# Altium PCB main_ADC_PCB.PcbDoc (part 4 of 8)
Units mm, origin at the board's own origin, x right, y up, seen from the top; angles counter-clockwise.
Board outline 150 x 100 mm, 4 copper layers (Top Layer, Layer 1, Layer 2, Bottom Layer), stack 1.62 mm thick; 535 components, 354 nets, 1725 pads, 1075 vias.
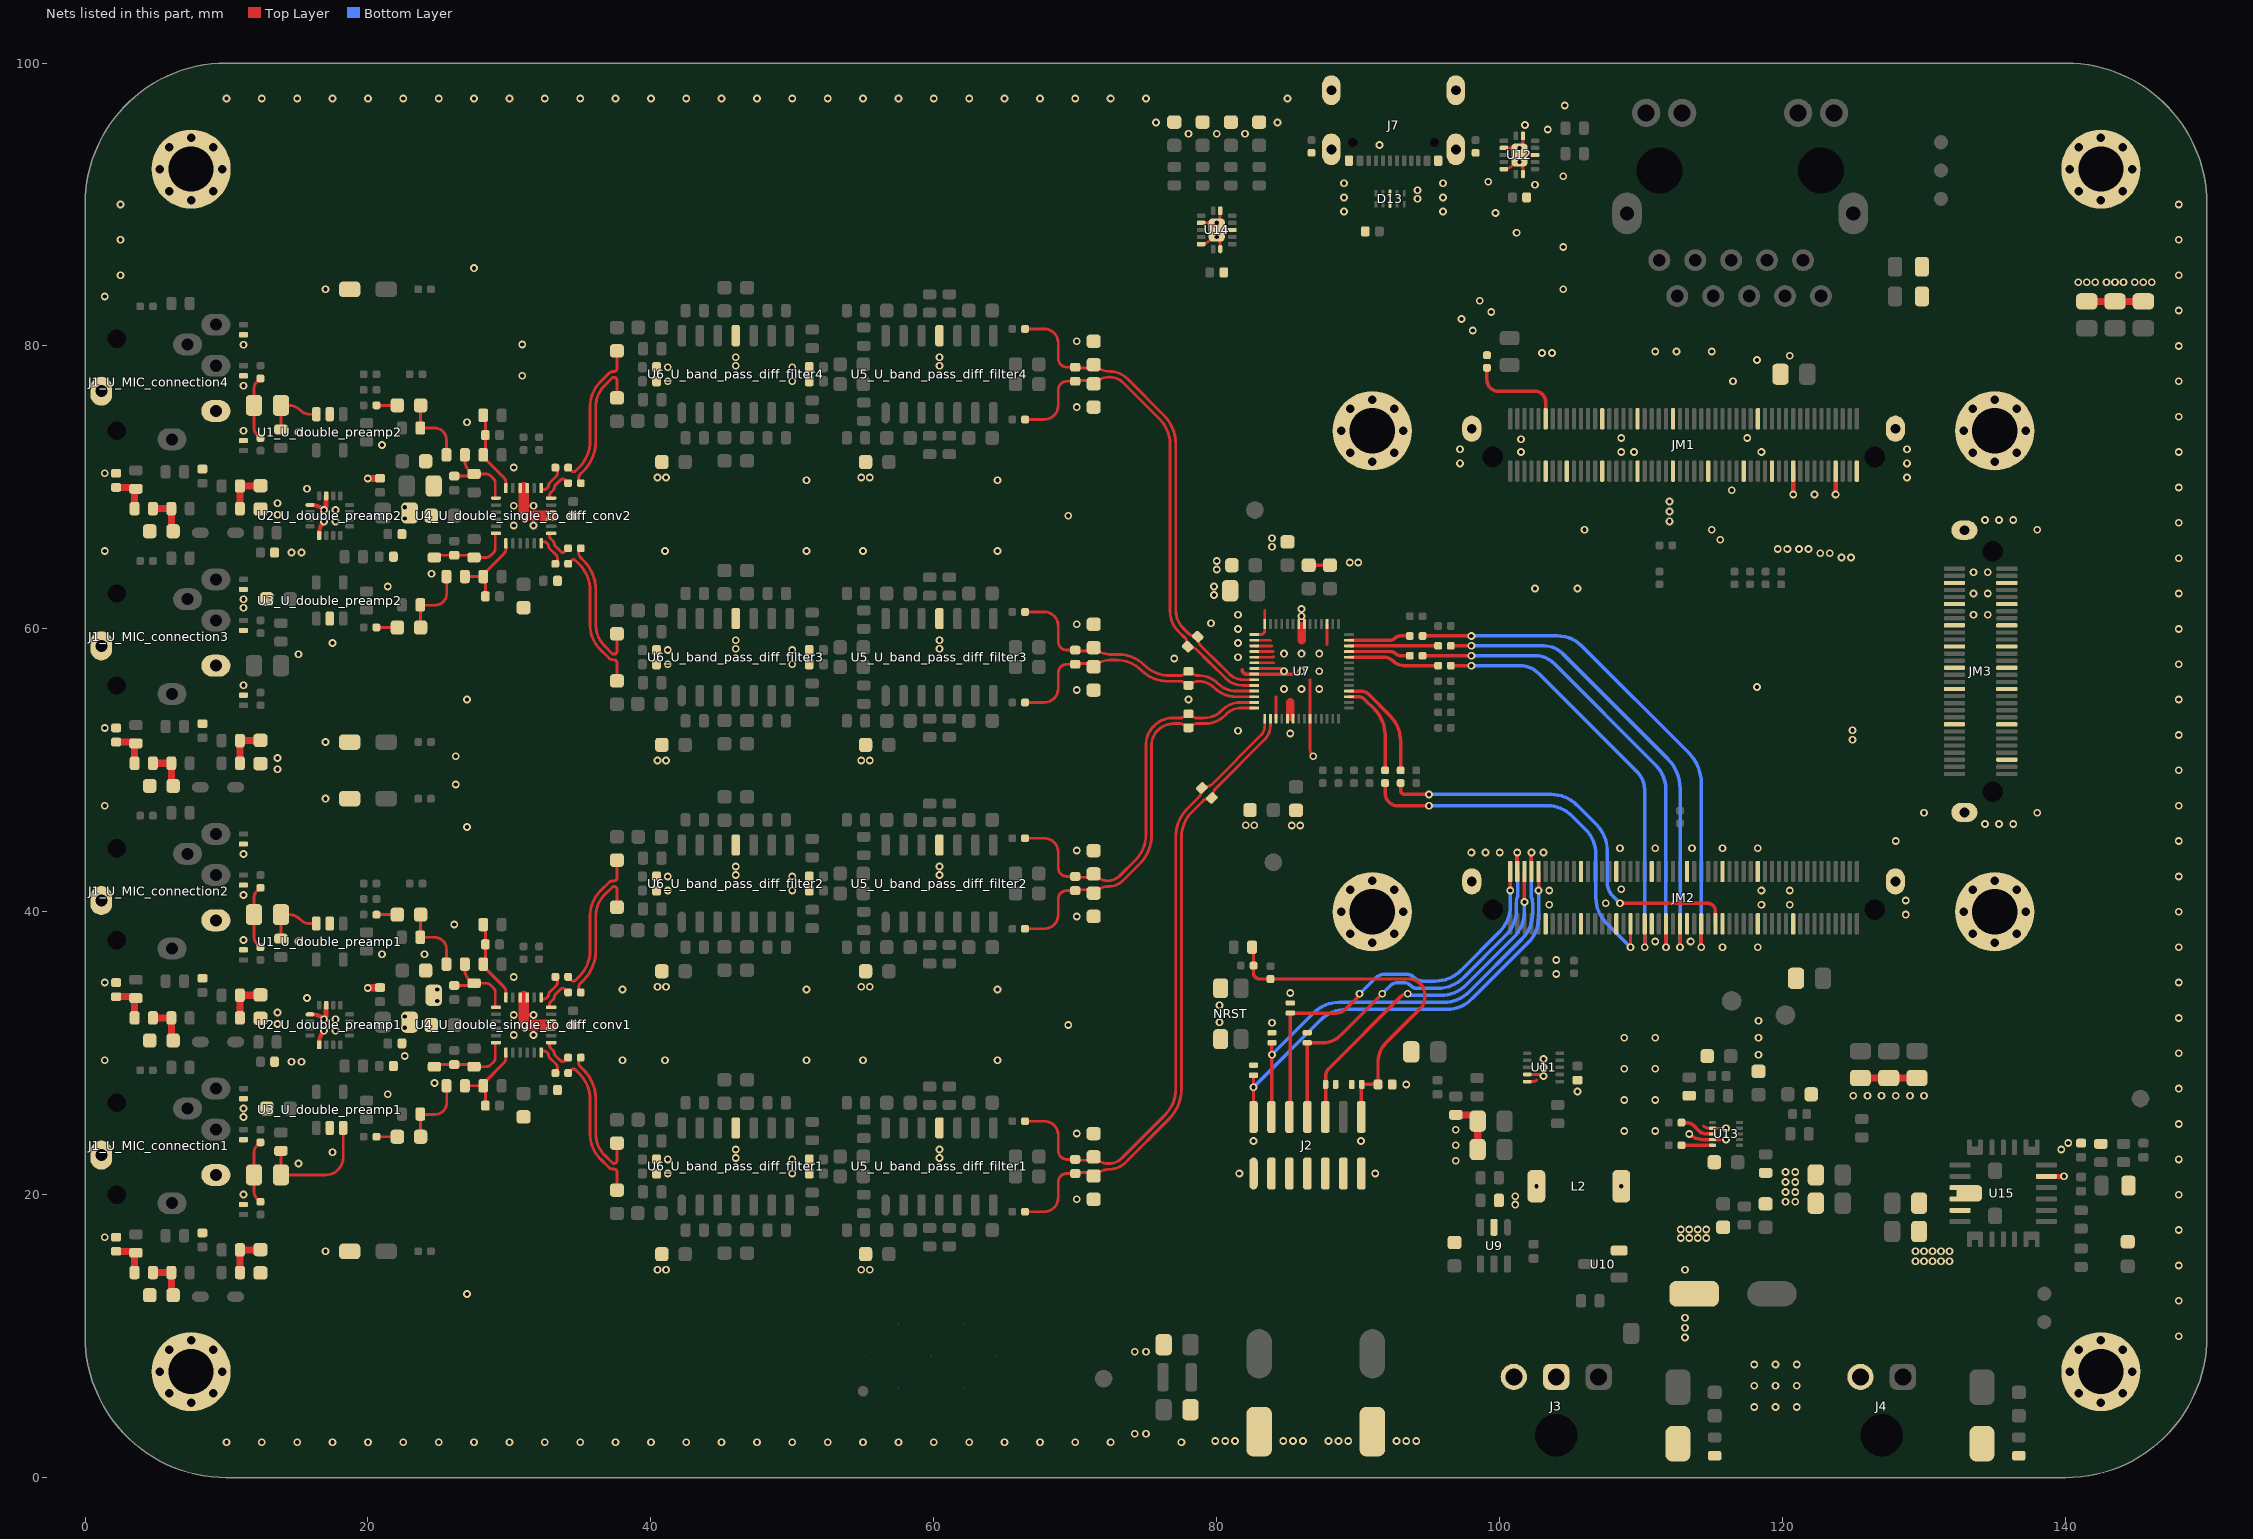
[diagram p6: the nets of this part, all layers, seen from the top]

## Via types
v1: diameter 0.55, hole 0.3, Top Layer to Bottom Layer, tented both sides, 1011 vias
v2: diameter 1, hole 0.6, Top Layer to Bottom Layer, 64 vias

## Nets (pads, with @x,y where several pads share a name; then routed paths per layer and width w, separated by ;. In a path a pad name is that pad's centre, name@x,y a point inside that pad or via, vN(x,y) a via of type N, cw(c..) or ccw(c..) an arc to the next point about the centre after c; other vN are vias at no path point) (continued)
GND: C1_U_MIC_connection1.1 C1_U_MIC_connection2.1 C1_U_MIC_connection3.1 C1_U_MIC_connection4.1 C2_U_MIC_connection1.1 C2_U_MIC_connection2.1 C2_U_MIC_connection3.1 C2_U_MIC_connection4.1 C3_U_MIC_connection1.2 C3_U_MIC_connection2.2 C3_U_MIC_connection3.2 C3_U_MIC_connection4.2 C4_U_double_preamp1.2 C4_U_double_preamp2.2 C7_U_double_preamp1.2 C7_U_double_preamp2.2 C8_U_double_preamp1.1 C8_U_double_preamp2.1 C9_U_double_preamp1.1 C9_U_double_preamp2.1 C10_U_double_preamp1.2 C10_U_double_preamp2.2 C11_U_double_preamp1.2 C11_U_double_preamp2.2 C12_U_double_preamp1.2 C12_U_double_preamp2.2 C13_U_double_preamp1.2 C13_U_double_preamp2.2 C16_U_double_single_to_diff_conv1.1 C16_U_double_single_to_diff_conv2.1 C17_U_double_single_to_diff_conv1.1 C17_U_double_single_to_diff_conv2.1 C18_U_double_single_to_diff_conv1.2 C18_U_double_single_to_diff_conv2.2 C19_U_double_single_to_diff_conv1.2 C19_U_double_single_to_diff_conv2.2 C26_U_band_pass_diff_filter1.1 C26_U_band_pass_diff_filter2.1 C26_U_band_pass_diff_filter3.1 C26_U_band_pass_diff_filter4.1 C29_U_band_pass_diff_filter1.2 C29_U_band_pass_diff_filter2.2 C29_U_band_pass_diff_filter3.2 C29_U_band_pass_diff_filter4.2 C30_U_band_pass_diff_filter1.2 C30_U_band_pass_diff_filter2.2 C30_U_band_pass_diff_filter3.2 C30_U_band_pass_diff_filter4.2 C41_U_band_pass_diff_filter1.2 C41_U_band_pass_diff_filter2.2 C41_U_band_pass_diff_filter3.2 C41_U_band_pass_diff_filter4.2 C42_U_band_pass_diff_filter1.2 C42_U_band_pass_diff_filter2.2 C42_U_band_pass_diff_filter3.2 C42_U_band_pass_diff_filter4.2 C43_U_band_pass_diff_filter1.2 C43_U_band_pass_diff_filter2.2 C43_U_band_pass_diff_filter3.2 C43_U_band_pass_diff_filter4.2 C44_U_band_pass_diff_filter1.1 C44_U_band_pass_diff_filter2.1 C44_U_band_pass_diff_filter3.1 C44_U_band_pass_diff_filter4.1 C45_U_band_pass_diff_filter1.1 C45_U_band_pass_diff_filter2.1 C45_U_band_pass_diff_filter3.1 C45_U_band_pass_diff_filter4.1 C46_U_MIC_connection1.2 C46_U_MIC_connection2.2 C46_U_MIC_connection3.2 C46_U_MIC_connection4.2 C47.2 C48.1 C49.1 C50.2 C51.2 C52.2 C53.2 C54.2 C55.2 C56.2 C58.2 C59.2 C60.2 C61.2 C62.1 C64.2 C65.2 C66.2 C67.1 C68.1 C69.1 C70.2 C71.1 C72.2 C73.2 C74.2 C75.2 C76.1 C77.1 C78.1 C79.1 C80.1 C81.1 C82.1 C83.1 C84.1 C85.1 C86.1 C87.2 C89.2 C91.1 D2_U_MIC_connection1.1 D2_U_MIC_connection2.1 D2_U_MIC_connection3.1 D2_U_MIC_connection4.1 D3_U_MIC_connection1.1 D3_U_MIC_connection2.1 D3_U_MIC_connection3.1 D3_U_MIC_connection4.1 D4_U_MIC_connection1.1 D4_U_MIC_connection2.1 D4_U_MIC_connection3.1 D4_U_MIC_connection4.1 D5.1 D6.2 D8.2 D9.2 D10.2 D11.2 D12.2 D13.3 D13.8 D14.1 D15.1 D17.2 D18.2 D19.2 D20.2 D21.1 D22.1 D23.1 J1_U_MIC_connection1.1 J1_U_MIC_connection1.4 J1_U_MIC_connection2.1 J1_U_MIC_connection2.4 J1_U_MIC_connection3.1 J1_U_MIC_connection3.4 J1_U_MIC_connection4.1 J1_U_MIC_connection4.4 J2.1 J2.3 J2.5 J2.7 J2.9 J2.11 J2.13 J3.1 J3.2 J4.1 J7.A1/B12 J7.B1/A12 J7.MT1 J7.MT2 J7.MT3 J7.MT4 JM1.1 JM1.7 JM1.19 JM1.25 JM1.30 JM1.33 JM1.43 JM1.53 JM1.54 JM1.63 JM1.64 JM1.73 JM1.74 JM1.83 JM1.89 JM1.S1 JM1.S2 JM2.19 JM2.29 JM2.30 JM2.39 JM2.40 JM2.49 JM2.50 JM2.59 JM2.60 JM2.69 JM2.70 JM2.79 JM2.80 JM2.89 JM2.S1 JM2.S2 JM3.5 JM3.6 JM3.11 JM3.12 JM3.17 JM3.18 JM3.23 JM3.24 JM3.29 JM3.30 JM3.35 JM3.36 JM3.45 JM3.46 JM3.55 JM3.S1 JM3.S2 L2.3 L2.4 MH1.1 MH2.1 MH3.1 MH4.1 MH5.1 MH6.1 MH7.1 MH8.1 NRST.3 NRST.4 R81.2 R85.2 R86.2 R89.2 R90.2 R91.2 R93.1 R95.1 R106.1 R113.2 R116.2 R122.2 R123.2 U1_U_double_preamp1.2 U1_U_double_preamp2.2 U2_U_double_preamp1.1 U2_U_double_preamp1.5 U2_U_double_preamp1.15 U2_U_double_preamp1.17 U2_U_double_preamp2.1 U2_U_double_preamp2.5 U2_U_double_preamp2.15 U2_U_double_preamp2.17 U3_U_double_preamp1.2 U3_U_double_preamp2.2 U4_U_double_single_to_diff_conv1.15 U4_U_double_single_to_diff_conv1.16 U4_U_double_single_to_diff_conv1.21 U4_U_double_single_to_diff_conv1.22 U4_U_double_single_to_diff_conv1.25 U4_U_double_single_to_diff_conv2.15 U4_U_double_single_to_diff_conv2.16 U4_U_double_single_to_diff_conv2.21 U4_U_double_single_to_diff_conv2.22 U4_U_double_single_to_diff_conv2.25 U5_U_band_pass_diff_filter1.11 U5_U_band_pass_diff_filter2.11 U5_U_band_pass_diff_filter3.11 U5_U_band_pass_diff_filter4.11 U6_U_band_pass_diff_filter1.11 U6_U_band_pass_diff_filter2.11 U6_U_band_pass_diff_filter3.11 U6_U_band_pass_diff_filter4.11 U7.17 U7.21 U7.22 U7.28 U7.29 U7.30 U7.31 U7.32 U7.33 U7.34 U7.35 U7.36 U7.45 U7.47 U7.48 U7.51 U7.57 U9.2 U10.2 U11.4 U11.5 U11.11 U12.1 U12.4 U12.7 U12.10 U12.13 U12.15 U13.2 U13.4 U13.11 U14.1 U14.4 U14.7 U14.10 U14.13 U14.15 U15.10 U15.12 U15.25 | length 74.3
  Top Layer w0.2: U2_U_double_preamp1.1@15.9,32.75 U2_U_double_preamp1.1@16.055,32.75 ; U2_U_double_preamp2.1@15.9,68.75 U2_U_double_preamp2.1@16.055,68.75 ; U2_U_double_preamp1.5@16.55,30.6 U2_U_double_preamp1.5@16.55,30.755 ; U2_U_double_preamp2.5@16.55,66.6 U2_U_double_preamp2.5@16.55,66.755 ; U14.13@78.9,87.2 ccw(c78.9,88.04) 79.494,87.446 U14.15@79.727,87.679 ; U14.10@78.9,88.7 v1(80,88.7) ccw(c79.396,89.304) 80.25,89.304 U14.7@80.25,89.55 ; v1(80,87.7) cw(c79.396,87.096) 80.25,87.096 U14.1@80.25,86.85 ; U14.15@80.3,88.2 U14.4@81.1,88.2 ; U7.35@82.65,57.2 v1@84.75,57.2 ; U7.34@82.65,57.6 84.025,57.6 ; U7.33@82.65,58 84,58 84.025,58.025 ; U7.32@82.65,58.4 84,58.4 ; U7.31@82.65,58.8 83.9,58.8 ; U7.30@82.65,59.2 83.775,59.2 83.8,59.175 ; U7.29@82.65,59.6 83.1,59.6 ccw(c83.1,59.9) 83.4,59.9 U7.28@83.4,60.35 83.4,61.3 ; U7.45@84.2,53.65 84.2,55.2 ; 86.6,56.4 U7.51@86.6,53.65 86.6,51.483 ccw(c87.283,51.483) v1@86.8,51 ; 87.8,58.9 U7.17@87.8,60.35 ; U12.13@100.3,92.5 ccw(c100.3,93.34) 100.894,92.746 U12.15@101.127,92.979 ; U12.10@100.3,94 v1(101.4,94) ccw(c100.796,94.604) 101.65,94.604 U12.7@101.65,94.85 ; v1(101.4,93) cw(c100.796,92.396) 101.65,92.396 U12.1@101.65,92.15 ; U12.15@101.7,93.5 U12.4@102.5,93.5 ; U11.5@101.95,28 102.359,28 ccw(c102.359,28.341) 102.6,28.1 ; U11.4@101.95,28.475 101.975,28.5 102,28.5 102.8,28.5 ; 114.412,24.86 ccw(c114.799,25.247) 114.799,24.7 U13.2@115.05,24.7 v1(116,24.7) ; JM1.19@120.75,71.15 JM1.19@120.8,71.2 ; JM1.7@123.7,71.3 JM1.7@123.75,71.25
  Top Layer w0.25: 81.8,57.1 ccw(c82.1,57.1) 82.1,56.8 U7.36@82.65,56.8 85.8,56.8 ; C51.2@86.5,64.5 C53.2@88,64.5 ; v1(113.4,24.3) ccw(c114.366,25.266) 114.366,23.9 U13.4@115.05,23.9 115.565,23.9
  Top Layer w0.3: U2_U_double_preamp1.1@16.055,32.75 cw(c16.055,31.555) v1(16.9,32.4) ; U2_U_double_preamp2.1@16.055,68.75 cw(c16.055,67.555) v1(16.9,68.4) ; U2_U_double_preamp1.5@16.55,30.755 cw(c17.745,30.755) v1(16.9,31.6) ; U2_U_double_preamp2.5@16.55,66.755 cw(c17.745,66.755) v1(16.9,67.6) ; v1(120.75,69.5) JM1.19@120.75,71.15 ; v1(123.75,69.5) JM1.7@123.75,71.25
  Top Layer w0.35: 17.05,32.645 U2_U_double_preamp1.15@17.05,33.4 ; 17.05,68.645 U2_U_double_preamp2.15@17.05,69.4 ; U15.25@138.65,21.3 v1(139.9,21.3)
  Top Layer w0.5: v1(19.987,70.621) 19.996,70.63 20.833,70.63 C8_U_double_preamp2.1@20.852,70.65 ; v1@19.996,34.63 C8_U_double_preamp1.1@20.833,34.63 ; R85.2@96.9,25.65 98,25.65 cw(c98,25.2) C62.1@98.45,25.2 C59.2@98.45,23.2 ; C84.1@125.5,28.25 C83.1@127.5,28.25 C81.1@129.5,28.25 ; C82.1@141.5,83.15 C86.1@143.5,83.15 C85.1@145.5,83.15
  Top Layer w0.6: 85.2,53.8 85.2,54.8 ; 86,59.2 86,60.2
  Top Layer w0.75: 31,34.025 v1(31,32) 33.025,32 ; 31,70.025 v1(31,68) 33.025,68
  other v1: 10,2.5 12.5,2.5 15,2.5 17.5,2.5 20,2.5 22.5,2.5 25,2.5 27.5,2.5 30,2.5 32.5,2.5 35,2.5 37.5,2.5 40,2.5 42.5,2.5 45,2.5 47.5,2.5 50,2.5 52.5,2.5 55,2.5 57.5,2.5 60,2.5 62.5,2.5 65,2.5 67.5,2.5 70,2.5 72.5,2.5 77.5,2.5 79.9,2.6 80.6,2.6 81.3,2.6 84.7,2.6 85.4,2.6 86.1,2.6 87.9,2.6 88.6,2.6 89.3,2.6 92.7,2.6 93.4,2.6 94.1,2.6 74.2,3.1 75,3.1 118,5 119.5,5 121,5 118,6.5 119.5,6.5 121,6.5 118,8 119.5,8 121,8 74.2,8.9 75,8.9 113.1,9.9 148,10 113.1,10.6 113.1,11.3 148,12.5 27,12.98 40.475,14.7 41.075,14.7 54.875,14.7 55.475,14.7 113.1,14.7 148,15 129.4,15.3 130,15.3 130.6,15.3 131.2,15.3 131.8,15.3 17,16 129.4,16 130,16 130.6,16 131.2,16 131.8,16 112.8,16.95 113.4,16.95 114,16.95 114.6,16.95 1.4,17 148,17.5 112.8,17.55 113.4,17.55 114,17.55 114.6,17.55 101.1,19.3 120.2,19.5 120.9,19.5 70.1,19.675 101.1,19.9 11.2,20.01 148,20 120.2,20.2 120.9,20.2 102.6,20.6 108.6,20.6 120.2,20.9 120.9,20.9 41.2,21.5 50,21.5 81.6,21.5 91.2,21.5 120.2,21.6 120.9,21.6 15.1,22.2 96.9,22.4 41.2,22.5 50,22.5 148,22.5 46,22.6 60.4,22.6 17.5,23 46,23.2 60.4,23.2 139.7,23.2 96.9,23.5 140.2,23.65 82.6,23.8 90.2,23.8 116,23.9 70.1,24.325 108.8,24.5 111,24.5 96.9,24.6 148,25 11.2,25.5 11.2,26.09 108.8,26.7 111,26.7 125,27 126,27 127,27 128,27 129,27 130,27 21.4,27.1 105.5,27.3 148,27.5 93.4,27.8 24.7,27.9 103.1,28.4 108.8,28.9 111,28.9 103.1,29 14.6,29.4 15.3,29.4 1.4,29.5 38,29.5 41,29.5 51,29.5 55,29.5 64.5,29.5 103.1,29.6 22.6,29.8 118.3,29.9 148,30 108.8,31.1 111,31.1 118.3,31.1 30.3,31.3 31.7,31.3 17.7,31.6 22.6,31.8 69.5,32 13.6,32.075 83.9,32.155 80.2,32.2 118.3,32.3 17.7,32.4 148,32.5 22.6,32.6 30.3,32.7 31.7,32.7 13.6,32.875 80.2,33.4 24.9,33.7 15.7,33.9 85.2,34.255 24.9,34.5 38,34.5 51,34.5 64.5,34.5 19.987,34.621 40.475,34.7 41.075,34.7 54.875,34.7 55.475,34.7 1.4,35 148,35 30.3,35.4 104,35.6 104,36.6 21,37 24,37 115.75,37.5 118.25,37.5 148,37.5 15.1,37.9 111,37.9 113.5,37.9 11.2,38.01 26.1,39.1 70.1,39.675 128.7,39.8 148,40 103.5,40.5 118.5,40.5 120.5,40.5 107.5,40.6 128.7,40.8 11.2,41.19 41.2,41.5 50,41.5 103.5,41.5 118.5,41.5 120.5,41.5 108.6,41.6 41.2,42.5 50,42.5 148,42.5 46,42.6 60.4,42.6 46,43.2 60.4,43.2 11.2,44.09 98,44.2 99,44.2 100,44.2 103.1,44.2 70.1,44.325 108.5,44.5 111,44.5 113.6,44.5 115.75,44.5 118.25,44.5 128,45 148,45 27,46 85.3,46.1 85.9,46.1 82.05,46.125 82.65,46.125 134.3,46.2 135.3,46.2 136.3,46.2 130,47 138,47 1.4,47.5 148,47.5 17,48 26.2,49 148,50 13.6,50.075 40.475,50.7 41.075,50.7 54.875,50.7 55.475,50.7 13.6,50.875 26.2,51 86.825,51 17,52 124.95,52.162 148,52.5 85.2,52.6 81.5,52.8 124.95,52.838 1.4,53 27,55 78,55 148,55 70.1,55.675 84.75,55.75 86,55.75 87.25,55.75 118.2,55.9 11.2,56.01 84.75,57 86,57 87.25,57 41.2,57.5 50,57.5 148,57.5 77,57.9 81.5,58 15.1,58.2 84.75,58.25 86,58.25 87.25,58.25 41.2,58.5 50,58.5 46,58.6 60.4,58.6 17.5,59 81.5,59 46,59.2 60.4,59.2 81.5,60 148,60 70.1,60.325 79.6,60.4 86,60.9 81.5,61 133.5,61 134.5,61 86,61.4 11.2,61.5 11.2,62.09 79.8,62.4 133.5,62.5 134.5,62.5 148,62.5 102.5,62.85 105.5,62.85 21.4,63 79.8,63 24.5,63.9 133.5,64 134.5,64 80,64.2 89.4,64.7 90,64.7 80,64.8 148,65 124.162,65.05 124.837,65.05 122.662,65.35 123.337,65.35 14.6,65.4 15.3,65.4 1.4,65.5 41,65.5 51,65.5 55,65.5 64.5,65.5 119.662,65.65 120.337,65.65 121.162,65.65 121.837,65.65 83.9,65.8 115.6,66.3 83.9,66.4 106,67 115,67 138,67 30.3,67.3 31.7,67.3 148,67.5 17.7,67.6 112,67.6 134.3,67.7 135.3,67.7 136.3,67.7 22.6,67.8 69.5,68 13.6,68.075 112,68.3 17.7,68.4 22.6,68.6 30.3,68.7 31.7,68.7 13.6,68.875 112,69 122.25,69.5 116.4,69.8 15.7,69.9 148,70 51,70.5 64.5,70.5 40.475,70.7 41.075,70.7 54.875,70.7 55.475,70.7 128.8,70.7 1.4,71 30.3,71.4 97.2,71.7 128.8,71.7 101.5,72.5 108.6,72.5 109.5,72.5 118.5,72.5 148,72.5 97.2,72.7 128.8,72.7 21,73 101.5,73.4 108.6,73.5 117.5,73.5 15.1,73.9 11.2,74.01 27,74.6 148,75 70.1,75.675 11.2,77.19 41.2,77.5 50,77.5 116.5,77.5 148,77.5 30.9,77.9 41.2,78.5 50,78.5 46,78.6 60.4,78.6 118.2,79 46,79.2 60.4,79.2 120.5,79.3 103,79.5 103.7,79.5 111,79.6 112.5,79.6 115,79.6 148,80 11.2,80.09 30.9,80.1 70.1,80.325 98.1,81.1 97.3,81.9 99.4,82.4 148,82.5 98.6,83.2 1.4,83.5 17,84 104.5,84 140.9,84.5 141.5,84.5 142.1,84.5 142.9,84.5 143.5,84.5 144.1,84.5 144.9,84.5 145.5,84.5 146.1,84.5 2.5,85 148,85 27.5,85.5 104.5,87 2.5,87.5 148,87.5 101.2,88 99.7,89.4 89,89.5 96,89.5 2.5,90 148,90 94.2,90.4 89,90.5 96,90.5 94.2,91 102.5,91.4 89,91.5 96,91.5 99.2,91.6 104.5,92 91.5,94.2 78,95 80,95 82,95 103.4,95.3 101.783,95.617 75.7,95.8 84.3,95.8 104.6,97 10,97.5 12.5,97.5 15,97.5 17.5,97.5 20,97.5 22.5,97.5 25,97.5 27.5,97.5 30,97.5 32.5,97.5 35,97.5 37.5,97.5 40,97.5 42.5,97.5 45,97.5 47.5,97.5 50,97.5 52.5,97.5 55,97.5 57.5,97.5 60,97.5 62.5,97.5 65,97.5 67.5,97.5 70,97.5 72.5,97.5 75,97.5 85,97.5
  other v2: 7.5,5.3 142.5,5.3 5.95,5.95 9.05,5.95 140.95,5.95 144.05,5.95 5.3,7.5 9.7,7.5 140.3,7.5 144.7,7.5 5.95,9.05 9.05,9.05 140.95,9.05 144.05,9.05 7.5,9.7 142.5,9.7 91,37.8 135,37.8 89.45,38.45 92.55,38.45 133.45,38.45 136.55,38.45 88.8,40 93.2,40 132.8,40 137.2,40 89.45,41.55 92.55,41.55 133.45,41.55 136.55,41.55 91,42.2 135,42.2 91,71.8 135,71.8 89.45,72.45 92.55,72.45 133.45,72.45 136.55,72.45 88.8,74 93.2,74 132.8,74 137.2,74 89.45,75.55 92.55,75.55 133.45,75.55 136.55,75.55 91,76.2 135,76.2 7.5,90.3 142.5,90.3 5.95,90.95 9.05,90.95 140.95,90.95 144.05,90.95 5.3,92.5 9.7,92.5 140.3,92.5 144.7,92.5 5.95,94.05 9.05,94.05 140.95,94.05 144.05,94.05 7.5,94.7 142.5,94.7
IN_1+_U_double_single_to_diff_conv1: C92_U_double_single_to_diff_conv1.2 R21_U_double_single_to_diff_conv1.2 R22_U_double_single_to_diff_conv1.1 U4_U_double_single_to_diff_conv1.24 | length 5.9
  Top Layer w0.2: R22_U_double_single_to_diff_conv1.1@28.15,39.1 cw(c27.788,38.738) 28.3,38.738 C92_U_double_single_to_diff_conv1.2@28.3,37.7 28.3,36.662 cw(c27.788,36.662) R21_U_double_single_to_diff_conv1.2@28.15,36.3 ccw(c28.512,36.3) 28.256,36.044 29.6,34.7 cw(c29.238,34.338) 29.75,34.338 U4_U_double_single_to_diff_conv1.24@29.75,33.952
IN_1+_U_double_single_to_diff_conv2: C92_U_double_single_to_diff_conv2.2 R21_U_double_single_to_diff_conv2.2 R22_U_double_single_to_diff_conv2.1 U4_U_double_single_to_diff_conv2.24 | length 5.9
  Top Layer w0.2: R22_U_double_single_to_diff_conv2.1@28.15,75.1 cw(c27.788,74.738) 28.3,74.738 C92_U_double_single_to_diff_conv2.2@28.3,73.7 28.3,72.662 cw(c27.788,72.662) R21_U_double_single_to_diff_conv2.2@28.15,72.3 ccw(c28.512,72.3) 28.256,72.044 29.6,70.7 cw(c29.238,70.338) 29.75,70.338 U4_U_double_single_to_diff_conv2.24@29.75,69.952
IN_1-_U_double_single_to_diff_conv1: C93_U_double_single_to_diff_conv1.2 R24_U_double_single_to_diff_conv1.1 R25_U_double_single_to_diff_conv1.2 U4_U_double_single_to_diff_conv1.1 | length 5.6
  Top Layer w0.2: C93_U_double_single_to_diff_conv1.2@26.1,34.8 27.138,34.8 ccw(c27.138,35.312) R25_U_double_single_to_diff_conv1.2@27.5,34.95 28.338,34.95 cw(c28.338,34.438) 28.7,34.8 28.859,34.641 cw(c28.517,34.3) 29,34.3 29,33.365 ccw(c29.163,33.365) U4_U_double_single_to_diff_conv1.1@29.048,33.25 ; R24_U_double_single_to_diff_conv1.1@26.85,36.3 26.85,35.929 ccw(c27.96,35.929) R25_U_double_single_to_diff_conv1.2@27.175,35.144
IN_1-_U_double_single_to_diff_conv2: C93_U_double_single_to_diff_conv2.2 R24_U_double_single_to_diff_conv2.1 R25_U_double_single_to_diff_conv2.2 U4_U_double_single_to_diff_conv2.1 | length 5.6
  Top Layer w0.2: C93_U_double_single_to_diff_conv2.2@26.1,70.8 27.138,70.8 ccw(c27.138,71.312) R25_U_double_single_to_diff_conv2.2@27.5,70.95 28.338,70.95 cw(c28.338,70.438) 28.7,70.8 28.859,70.641 cw(c28.517,70.3) 29,70.3 29,69.365 ccw(c29.163,69.365) U4_U_double_single_to_diff_conv2.1@29.048,69.25 ; R24_U_double_single_to_diff_conv2.1@26.85,72.3 26.85,71.929 ccw(c27.96,71.929) R25_U_double_single_to_diff_conv2.2@27.175,71.144
IN_2+_U_double_single_to_diff_conv1: C94_U_double_single_to_diff_conv1.2 R27_U_double_single_to_diff_conv1.2 R29_U_double_single_to_diff_conv1.1 U4_U_double_single_to_diff_conv1.6 | length 5.8
  Top Layer w0.2: R29_U_double_single_to_diff_conv1.1@24.7,29.05 cw(c25.062,28.688) 25.062,29.2 C94_U_double_single_to_diff_conv1.2@26.1,29.2 27.138,29.2 cw(c27.138,28.688) R27_U_double_single_to_diff_conv1.2@27.5,29.05 28.338,29.05 ccw(c28.338,29.562) 28.7,29.2 28.859,29.359 ccw(c28.517,29.7) 29,29.7 29,30.635 cw(c29.163,30.635) U4_U_double_single_to_diff_conv1.6@29.048,30.75
IN_2+_U_double_single_to_diff_conv2: C94_U_double_single_to_diff_conv2.2 R27_U_double_single_to_diff_conv2.2 R29_U_double_single_to_diff_conv2.1 U4_U_double_single_to_diff_conv2.6 | length 5.8
  Top Layer w0.2: R29_U_double_single_to_diff_conv2.1@24.7,65.05 cw(c25.062,64.688) 25.062,65.2 C94_U_double_single_to_diff_conv2.2@26.1,65.2 27.138,65.2 cw(c27.138,64.688) R27_U_double_single_to_diff_conv2.2@27.5,65.05 28.338,65.05 ccw(c28.338,65.562) 28.7,65.2 28.859,65.359 ccw(c28.517,65.7) 29,65.7 29,66.635 cw(c29.163,66.635) U4_U_double_single_to_diff_conv2.6@29.048,66.75
IN_2-_U_double_single_to_diff_conv1: C95_U_double_single_to_diff_conv1.2 R31_U_double_single_to_diff_conv1.1 R32_U_double_single_to_diff_conv1.2 U4_U_double_single_to_diff_conv1.7 | length 5.7
  Top Layer w0.2: R31_U_double_single_to_diff_conv1.1@26.85,27.7 R32_U_double_single_to_diff_conv1.2@28.15,27.7 ; C95_U_double_single_to_diff_conv1.2@28.3,26.3 28.3,27.338 ccw(c27.788,27.338) R32_U_double_single_to_diff_conv1.2@28.15,27.7 ; U4_U_double_single_to_diff_conv1.7@29.75,30.048 29.75,29.662 cw(c29.238,29.662) 29.6,29.3 28.256,27.956 ccw(c28.512,27.7) R32_U_double_single_to_diff_conv1.2@28.15,27.7
IN_2-_U_double_single_to_diff_conv2: C95_U_double_single_to_diff_conv2.2 R31_U_double_single_to_diff_conv2.1 R32_U_double_single_to_diff_conv2.2 U4_U_double_single_to_diff_conv2.7 | length 5.7
  Top Layer w0.2: R31_U_double_single_to_diff_conv2.1@26.85,63.7 R32_U_double_single_to_diff_conv2.2@28.15,63.7 ; C95_U_double_single_to_diff_conv2.2@28.3,62.3 28.3,63.338 ccw(c27.788,63.338) R32_U_double_single_to_diff_conv2.2@28.15,63.7 ; U4_U_double_single_to_diff_conv2.7@29.75,66.048 29.75,65.662 cw(c29.238,65.662) 29.6,65.3 28.256,63.956 ccw(c28.512,63.7) R32_U_double_single_to_diff_conv2.2@28.15,63.7
IO0: R56.2 U7.3 | length 6.7
  Top Layer w0.245: U7.3@89.35,55.2 90.034,55.2 cw(c90.034,54.634) 90.434,55.034 91.156,54.313 cw(c89.36,52.517) 91.9,52.517 R56.2@91.9,50
IO0_FPGA: JM2.65 R56.1 | length 27
  Top Layer w0.245: R56.1@91.9,49.1 91.9,48.4 ccw(c92.8,48.4) 92.8,47.5 v1(95,47.5) ; v1(109.25,37.5) JM2.65@109.25,39.15
  Bottom Layer w0.245: v1(95,47.5) 103.348,47.5 cw(c103.348,44.96) 105.144,46.756 106.056,45.844 cw(c104.26,44.048) 106.8,44.048 106.8,41.002 ccw(c109.34,41.002) 107.544,39.206 v1(109.25,37.5)
IO1: R58.2 U7.4 | length 7.6
  Top Layer w0.245: U7.4@89.35,55.6 90.217,55.6 cw(c90.217,54.917) 90.7,55.4 92.256,53.844 cw(c90.46,52.048) 93,52.048 R58.2@93,50
IO1_FPGA: JM2.41 R58.1 | length 29.3
  Top Layer w0.245: R58.1@93,49.1 93,48.6 ccw(c93.3,48.6) 93.3,48.3 v1(95,48.3) ; v1(108.5,40.6) 114.704,40.6 cw(c114.704,40.054) 115.25,40.054 JM2.41@115.25,39.15
  Bottom Layer w0.245: v1(95,48.3) 103.648,48.3 cw(c103.648,45.76) 105.444,47.556 106.856,46.144 cw(c105.06,44.348) 107.6,44.348 107.6,42.136 ccw(c109.136,42.136) 108.05,41.05 v1(108.5,40.6)
IO4: R60.2 U7.10 | length 6.5
  Top Layer w0.245: U7.10@89.35,58 91.774,58 91.776,58 cw(c91.776,56.976) 92.5,57.7 ccw(c93.224,58.424) 93.225,57.4 ; 93.227,57.4 R60.2@95.65,57.4
IO4_FPGA: JM2.61 R60.1 | length 30.4
  Top Layer w0.245: R60.1@96.55,57.4 v1(98,57.4) ; v1(110.25,37.5) JM2.61@110.25,39.15
  Bottom Layer w0.245: v1(98,57.4) 101.433,57.4 101.434,57.4 cw(c101.434,55.551) 102.743,56.857 109.75,49.85 cw(c108.543,48.643) 110.25,48.643 v1(110.25,37.5)
IO5: R62.2 U7.11 | length 4.4
  Top Layer w0.245: U7.11@89.35,58.4 92.28,58.4 ; 92.281,58.4 cw(c92.283,57.888) 92.645,58.25 ccw(c93.007,58.612) 93.008,58.1 93.513,58.1 R62.2@93.65,58.1
IO5_FPGA: JM2.55 R62.1 | length 34.3
  Top Layer w0.245: R62.1@94.55,58.1 v1(98,58.1) ; v1(111.75,37.5) JM2.55@111.75,39.15
  Bottom Layer w0.245: v1(98,58.1) 102.533,58.1 cw(c102.533,56.248) 103.842,57.558 103.844,57.556 111.035,50.365 cw(c109.308,48.639) 111.75,48.639 v1(111.75,37.5)
IO6: R64.2 U7.12 | length 6.3
  Top Layer w0.245: U7.12@89.35,58.8 93,58.8 R64.2@95.65,58.8
IO6_FPGA: JM2.51 R64.1 | length 33.8
  Top Layer w0.245: R64.1@96.55,58.8 v1(98,58.8) ; v1(112.75,37.5) JM2.51@112.75,39.15
  Bottom Layer w0.245: v1(98,58.8) 103.133,58.8 103.134,58.8 cw(c103.134,56.951) 104.441,58.259 104.443,58.257 111.865,50.835 cw(c109.727,48.698) 112.75,48.698 v1(112.75,37.5)
IO7: R66.2 U7.13 | length 4.4
  Top Layer w0.245: U7.13@89.35,59.2 92.253,59.2 ; 92.254,59.2 ccw(c92.256,59.694) 92.605,59.345 cw(c92.98,58.969) 92.98,59.5 R66.2@93.65,59.5
IO7_FPGA: JM2.45 R66.1 | length 37.8
  Top Layer w0.245: R66.1@94.55,59.5 v1(98,59.5) ; v1(114.25,37.5) JM2.45@114.25,39.15
  Bottom Layer w0.245: v1(98,59.5) 104.097,59.5 104.099,59.5 cw(c104.099,57.083) 105.809,58.791 113.37,51.23 113.371,51.229 cw(c111.25,49.108) 114.25,49.108 114.25,49.106 v1(114.25,37.5)
JTAG_SEL: JM1.90 R106.2 | length 7.1
  Top Layer w0.25: R106.2@99.1,78.45 99.1,77.6 ccw(c99.9,77.6) 99.9,76.8 102.5,76.8 cw(c102.5,76.05) 103.25,76.05 JM1.90@103.25,74.85
JTAG_SRSTn: C61.1 D12.1 J2.14 R108.1 R109.1 R110.2 | length 25.9
  Top Layer w0.245: R109.1@82.5,37.5 cw(c82.259,37.259) 82.6,37.259 R108.1@82.6,36.2 82.6,35.641 ccw(c82.941,35.641) 82.7,35.4 ccw(c83.062,35.762) 83.062,35.25 R110.2@83.8,35.25 93.6,35.25 cw(c93.6,34.164) 94.368,34.932 94.4,34.9 cw(c93.676,34.176) 94.7,34.176 94.7,33.9 cw(c93.658,33.9) 94.395,33.163 91.963,30.732 ccw(c93.322,29.372) 91.4,29.372 ; J2.14@90.22,25.5 90.22,27.715 cw(c90.34,27.715) D12.1@90.255,27.8 C61.1@91.4,27.8 91.4,29.371
JTAG_TCK: D8.1 J2.6 JM2.100 | length 29
  Top Layer w0.245: J2.6@85.2,25.645 D8.1@85.2,32.845 88.484,32.845 ccw(c88.484,33.716) 89.1,33.1 90.029,34.029 ccw(c89.859,34.2) v1(90.1,34.2) ; v1(100.75,41.5) JM2.100@100.75,42.85
  Bottom Layer w0.245: v1(90.1,34.2) 91.2,35.3 cw(c91.924,34.576) 91.924,35.6 93.395,35.6 cw(c93.395,34.885) 93.901,35.391 ccw(c94.602,36.092) 94.602,35.1 ; 94.603,35.1 95.448,35.1 ccw(c95.448,37.64) 97.244,35.844 100.006,38.606 ccw(c98.21,40.402) 100.75,40.402 v1(100.75,41.5)
JTAG_TDI: D9.1 J2.10 JM2.96 | length 25.2
  Top Layer w0.245: J2.10@87.68,25.5 ccw(c87.632,25.548) 87.7,25.548 D9.1@87.7,27.8 87.7,28.4 cw(c88.424,28.4) 87.912,28.912 92.988,33.988 cw(c93.5,33.476) v1(93.5,34.2) ; v1(101.75,40.7) JM2.96@101.75,42.85
  Bottom Layer w0.245: v1(93.5,34.2) ccw(c93.741,34.441) 93.741,34.1 95.848,34.1 ccw(c95.848,36.64) 97.644,34.844 101.006,38.206 ccw(c99.21,40.002) 101.75,40.002 v1(101.75,40.7)
JTAG_TDO: D11.1 J2.8 JM2.98 | length 29.7
  Top Layer w0.245: J2.8@86.4,25.524 D11.1@86.4,30.745 87.459,30.745 ; 87.46,30.745 ccw(c87.46,32.64) 88.8,31.3 v1(91.7,34.2) ; JM2.98@101.25,42.85 v1@101.25,44.1
  Bottom Layer w0.245: v1(91.7,34.2) 92.3,34.8 cw(c92.783,34.317) 92.783,35 93.217,35 cw(c93.217,34.317) 93.7,34.8 93.771,34.729 ccw(c94.083,35.041) 94.083,34.6 95.648,34.6 ccw(c95.648,37.14) 97.444,35.344 100.433,38.333 ccw(c98.637,40.129) 101.177,40.129 101.177,40.452 101.189,40.933 ccw(c100.988,41.134) 101.272,41.134 101.272,41.497 ccw(c100.75,41.5) 101.272,41.506 101.271,41.7 v1@101.253,44.1
  other v1: 101.25,44.2
JTAG_TMS: D10.1 J2.4 JM2.94 | length 33.6
  Top Layer w0.245: J2.4@83.87,25.5 ccw(c83.798,25.572) 83.9,25.572 v1(83.9,29.9) D10.1@83.9,30.745 ; JM2.94@102.25,42.85 v1@102.25,44.1
  Bottom Layer w0.245: v1(83.9,29.9) 86.856,32.856 cw(c88.652,31.06) 88.652,33.6 96.048,33.6 ccw(c96.048,36.14) 97.844,34.344 101.579,38.079 ccw(c99.783,39.875) 102.323,39.875 102.323,40.452 102.311,40.933 cw(c102.512,41.134) 102.228,41.134 102.228,41.497 cw(c102.75,41.5) 102.228,41.506 102.229,41.7 v1@102.247,44.1
  other v1: 102.25,44.2
JTAG_VREF: D6.1 J2.2 JM2.92 | length 31.6
  Top Layer w0.245: J2.2@82.6,25.5 v1(82.6,27.6) D6.1@82.6,28.445 ; v1(102.75,41.5) JM2.92@102.75,42.85
  Bottom Layer w0.245: v1(82.6,27.6) 87.356,32.356 cw(c89.152,30.56) 89.152,33.1 96.248,33.1 ccw(c96.248,35.64) 98.044,33.844 102.006,37.806 ccw(c100.21,39.602) 102.75,39.602 v1(102.75,41.5)
LDO_EN1: R97.1 U13.3 | length 2.5
  Top Layer w0.245: R97.1@112.85,25.1 113.217,25.1 cw(c113.217,24.417) 113.7,24.9 114.1,24.5 ccw(c114.583,24.983) 114.583,24.3 U13.3@115.05,24.3
LDO_EN2: R96.1 U13.5 | length 2.2
  Top Layer w0.245: R96.1@112.85,23.5 U13.5@115.05,23.5
MIC1_DIFF_R_U_double_single_to_diff_conv1_N: R23_U_double_single_to_diff_conv1.2 U4_U_double_single_to_diff_conv1.19 | length 2.3
  Top Layer w0.2: U4_U_double_single_to_diff_conv1.19@32.25,33.952 32.25,33.883 ccw(c32.293,33.883) 32.263,33.853 ccw(c32.293,33.883) 32.293,33.841 32.416,33.841 ccw(c32.416,34.182) 32.658,33.941 32.706,33.989 ccw(c32.543,34.152) 32.774,34.152 cw(c33.005,34.152) 32.841,34.316 33.288,34.762 ccw(c33.005,35.045) 33.405,35.045 33.402,35.048 33.402,35.148 ccw(c33.16,35.148) 33.331,35.319 R23_U_double_single_to_diff_conv1.2@33.25,35.4
MIC1_DIFF_R_U_double_single_to_diff_conv1_P: R26_U_double_single_to_diff_conv1.2 U4_U_double_single_to_diff_conv1.18 | length 2.3
  Top Layer w0.2: U4_U_double_single_to_diff_conv1.18@32.952,33.25 32.883,33.25 cw(c32.883,33.293) 32.853,33.263 cw(c32.883,33.293) 32.841,33.293 32.841,33.416 cw(c33.182,33.416) 32.941,33.658 33.106,33.823 ccw(c32.943,33.987) 33.174,33.987 cw(c33.405,33.987) 33.241,34.15 33.629,34.538 cw(c33.771,34.396) 33.771,34.596 cw(c33.771,34.396) 33.912,34.538 R26_U_double_single_to_diff_conv1.2@34.15,34.3
MIC1_DIFF_R_U_double_single_to_diff_conv2_N: R23_U_double_single_to_diff_conv2.2 U4_U_double_single_to_diff_conv2.19 | length 2.3
  Top Layer w0.2: U4_U_double_single_to_diff_conv2.19@32.25,69.952 32.25,69.883 ccw(c32.293,69.883) 32.263,69.853 ccw(c32.293,69.883) 32.293,69.841 32.416,69.841 ccw(c32.416,70.182) 32.658,69.941 32.706,69.989 ccw(c32.543,70.152) 32.774,70.152 cw(c33.005,70.152) 32.841,70.316 33.288,70.762 ccw(c33.005,71.045) 33.405,71.045 33.402,71.048 33.402,71.148 ccw(c33.16,71.148) 33.331,71.319 R23_U_double_single_to_diff_conv2.2@33.25,71.4
MIC1_DIFF_R_U_double_single_to_diff_conv2_P: R26_U_double_single_to_diff_conv2.2 U4_U_double_single_to_diff_conv2.18 | length 2.3
  Top Layer w0.2: U4_U_double_single_to_diff_conv2.18@32.952,69.25 32.883,69.25 cw(c32.883,69.293) 32.853,69.263 cw(c32.883,69.293) 32.841,69.293 32.841,69.416 cw(c33.182,69.416) 32.941,69.658 33.106,69.823 ccw(c32.943,69.987) 33.174,69.987 cw(c33.405,69.987) 33.241,70.15 33.629,70.538 cw(c33.771,70.396) 33.771,70.596 cw(c33.771,70.396) 33.912,70.538 R26_U_double_single_to_diff_conv2.2@34.15,70.3
MIC1_DIFF_U_double_single_to_diff_conv1_N: C36_U_band_pass_diff_filter2.2 R23_U_double_single_to_diff_conv1.1 | length 10.3
  Top Layer w0.2: R23_U_double_single_to_diff_conv1.1@34.15,35.4 34.388,35.162 ccw(c34.529,35.304) 34.529,35.104 ccw(c34.529,35.304) 34.671,35.162 34.955,35.446 ccw(c33.159,37.242) 35.699,37.242 35.699,39.708 cw(c38.179,39.708) 36.425,41.461 37.034,42.07 cw(c37.317,41.788) 37.317,42.187 37.4,42.187 ccw(c37.4,42.387) 37.541,42.246 ccw(c37.4,42.387) 37.6,42.388 C36_U_band_pass_diff_filter2.2@37.6,43.65
MIC1_DIFF_U_double_single_to_diff_conv1_P: C24_U_band_pass_diff_filter2.2 R26_U_double_single_to_diff_conv1.1 | length 10
  Top Layer w0.2: R26_U_double_single_to_diff_conv1.1@35.05,34.3 34.969,34.381 cw(c35.14,34.552) 34.898,34.552 34.898,34.652 34.895,34.655 cw(c35.295,34.655) 35.012,34.938 35.238,35.164 ccw(c33.159,37.242) 36.099,37.242 36.099,39.708 cw(c38.179,39.708) 36.708,41.178 37.259,41.729 cw(c37.4,41.587) 37.4,41.787 cw(c37.4,41.588) 37.541,41.729 cw(c37.4,41.587) 37.6,41.587 C24_U_band_pass_diff_filter2.2@37.6,40.325
MIC1_DIFF_U_double_single_to_diff_conv2_N: C36_U_band_pass_diff_filter4.2 R23_U_double_single_to_diff_conv2.1 | length 10.3
  Top Layer w0.2: R23_U_double_single_to_diff_conv2.1@34.15,71.4 34.388,71.162 ccw(c34.529,71.304) 34.529,71.104 ccw(c34.529,71.304) 34.671,71.162 34.955,71.446 ccw(c33.159,73.242) 35.699,73.242 35.699,75.708 cw(c38.179,75.708) 36.425,77.461 37.034,78.07 cw(c37.317,77.788) 37.317,78.187 37.4,78.187 ccw(c37.4,78.387) 37.541,78.246 ccw(c37.4,78.388) 37.6,78.388 C36_U_band_pass_diff_filter4.2@37.6,79.65
MIC1_DIFF_U_double_single_to_diff_conv2_P: C24_U_band_pass_diff_filter4.2 R26_U_double_single_to_diff_conv2.1 | length 10
  Top Layer w0.2: R26_U_double_single_to_diff_conv2.1@35.05,70.3 34.969,70.381 cw(c35.14,70.552) 34.898,70.552 34.898,70.652 34.895,70.655 cw(c35.295,70.655) 35.012,70.938 35.238,71.164 ccw(c33.159,73.242) 36.099,73.242 36.099,75.708 cw(c38.179,75.708) 36.708,77.178 37.259,77.729 cw(c37.4,77.588) 37.4,77.787 cw(c37.4,77.588) 37.541,77.729 cw(c37.4,77.587) 37.6,77.587 C24_U_band_pass_diff_filter4.2@37.6,76.325
MIC2_DIFF_R_U_double_single_to_diff_conv1_N: R28_U_double_single_to_diff_conv1.2 U4_U_double_single_to_diff_conv1.13 | length 2.3
  Top Layer w0.2: U4_U_double_single_to_diff_conv1.13@32.952,30.75 32.883,30.75 ccw(c32.883,30.707) 32.853,30.737 ccw(c32.883,30.707) 32.841,30.707 32.841,30.584 ccw(c33.182,30.584) 32.941,30.342 33.106,30.177 cw(c32.943,30.013) 33.174,30.013 ccw(c33.405,30.013) 33.241,29.85 33.629,29.462 ccw(c33.771,29.604) 33.771,29.404 ccw(c33.771,29.604) 33.912,29.462 R28_U_double_single_to_diff_conv1.2@34.15,29.7
MIC2_DIFF_R_U_double_single_to_diff_conv1_P: R30_U_double_single_to_diff_conv1.2 U4_U_double_single_to_diff_conv1.12 | length 2.3
  Top Layer w0.2: U4_U_double_single_to_diff_conv1.12@32.25,30.048 32.25,30.117 cw(c32.293,30.117) 32.263,30.147 cw(c32.293,30.117) 32.293,30.159 32.416,30.159 cw(c32.416,29.818) 32.658,30.059 32.706,30.011 cw(c32.543,29.848) 32.774,29.848 ccw(c33.005,29.848) 32.841,29.684 33.288,29.238 cw(c33.005,28.955) 33.405,28.955 33.402,28.952 33.402,28.852 cw(c33.16,28.852) 33.331,28.681 R30_U_double_single_to_diff_conv1.2@33.25,28.6
MIC2_DIFF_R_U_double_single_to_diff_conv2_N: R28_U_double_single_to_diff_conv2.2 U4_U_double_single_to_diff_conv2.13 | length 2.3
  Top Layer w0.2: U4_U_double_single_to_diff_conv2.13@32.952,66.75 32.883,66.75 ccw(c32.883,66.707) 32.853,66.737 ccw(c32.883,66.707) 32.841,66.707 32.841,66.584 ccw(c33.182,66.584) 32.941,66.342 33.106,66.177 cw(c32.943,66.013) 33.174,66.013 ccw(c33.405,66.013) 33.241,65.85 33.629,65.462 ccw(c33.771,65.604) 33.771,65.404 ccw(c33.771,65.604) 33.912,65.462 R28_U_double_single_to_diff_conv2.2@34.15,65.7
MIC2_DIFF_R_U_double_single_to_diff_conv2_P: R30_U_double_single_to_diff_conv2.2 U4_U_double_single_to_diff_conv2.12 | length 2.3
  Top Layer w0.2: U4_U_double_single_to_diff_conv2.12@32.25,66.048 32.25,66.117 cw(c32.293,66.117) 32.263,66.147 cw(c32.293,66.117) 32.293,66.159 32.416,66.159 cw(c32.416,65.818) 32.658,66.059 32.706,66.011 cw(c32.543,65.848) 32.774,65.848 ccw(c33.005,65.848) 32.841,65.684 33.288,65.238 cw(c33.005,64.955) 33.405,64.955 33.402,64.952 33.402,64.852 cw(c33.16,64.852) 33.331,64.681 R30_U_double_single_to_diff_conv2.2@33.25,64.6
MIC2_DIFF_U_double_single_to_diff_conv1_N: C36_U_band_pass_diff_filter1.2 R28_U_double_single_to_diff_conv1.1 | length 10
  Top Layer w0.2: R28_U_double_single_to_diff_conv1.1@35.05,29.7 34.969,29.619 ccw(c35.14,29.448) 34.898,29.448 34.898,29.348 34.895,29.345 ccw(c35.295,29.345) 35.012,29.062 35.238,28.836 cw(c33.159,26.758) 36.099,26.758 36.099,24.292 ccw(c38.179,24.292) 36.708,22.822 37.259,22.271 ccw(c37.4,22.413) 37.4,22.213 ccw(c37.4,22.413) 37.541,22.271 ccw(c37.4,22.413) 37.6,22.413 C36_U_band_pass_diff_filter1.2@37.6,23.675
MIC2_DIFF_U_double_single_to_diff_conv1_P: C24_U_band_pass_diff_filter1.2 R30_U_double_single_to_diff_conv1.1 | length 10.3
  Top Layer w0.2: R30_U_double_single_to_diff_conv1.1@34.15,28.6 34.388,28.838 cw(c34.529,28.696) 34.529,28.896 cw(c34.529,28.696) 34.671,28.838 34.955,28.554 cw(c33.159,26.758) 35.699,26.758 35.699,24.292 ccw(c38.179,24.292) 36.425,22.539 37.034,21.93 ccw(c37.317,22.213) 37.317,21.813 37.4,21.813 cw(c37.4,21.613) 37.541,21.754 cw(c37.4,21.613) 37.6,21.613 C24_U_band_pass_diff_filter1.2@37.6,20.35
MIC2_DIFF_U_double_single_to_diff_conv2_N: C36_U_band_pass_diff_filter3.2 R28_U_double_single_to_diff_conv2.1 | length 10
  Top Layer w0.2: R28_U_double_single_to_diff_conv2.1@35.05,65.7 34.969,65.619 ccw(c35.14,65.448) 34.898,65.448 34.898,65.348 34.895,65.345 ccw(c35.295,65.345) 35.012,65.062 35.238,64.836 cw(c33.159,62.758) 36.099,62.758 36.099,60.292 ccw(c38.179,60.292) 36.708,58.822 37.259,58.271 ccw(c37.4,58.413) 37.4,58.213 ccw(c37.4,58.413) 37.541,58.271 ccw(c37.4,58.413) 37.6,58.413 C36_U_band_pass_diff_filter3.2@37.6,59.675
MIC2_DIFF_U_double_single_to_diff_conv2_P: C24_U_band_pass_diff_filter3.2 R30_U_double_single_to_diff_conv2.1 | length 10.3
  Top Layer w0.2: R30_U_double_single_to_diff_conv2.1@34.15,64.6 34.388,64.838 cw(c34.529,64.696) 34.529,64.896 cw(c34.529,64.696) 34.671,64.838 34.955,64.554 cw(c33.159,62.758) 35.699,62.758 35.699,60.292 ccw(c38.179,60.292) 36.425,58.539 37.034,57.93 ccw(c37.317,58.213) 37.317,57.813 37.4,57.813 cw(c37.4,57.613) 37.541,57.754 cw(c37.4,57.613) 37.6,57.613 C24_U_band_pass_diff_filter3.2@37.6,56.35
MIC_FILTER_OUT_U_band_pass_diff_filter1_N: C33_U_band_pass_diff_filter1.1 C38_U_band_pass_diff_filter1.1 C43_U_band_pass_diff_filter1.1 R49_U_band_pass_diff_filter1.2 U7.43 | length 43.8
  Top Layer w0.2: R49_U_band_pass_diff_filter1.2@66.45,25.2 67.8,25.2 cw(c67.8,24.2) 68.8,24.2 68.8,23.1 ccw(c69.4,23.1) 69.4,22.5 C33_U_band_pass_diff_filter1.1@70,22.5 ; C33_U_band_pass_diff_filter1.1@70.205,22.437 C43_U_band_pass_diff_filter1.1@71.037,22.437 ; C43_U_band_pass_diff_filter1.1@71.3,22.675 cw(c71.3,22.573) 71.372,22.645 71.434,22.583 ccw(c72.359,23.507) 72.359,22.2 ccw(c72.359,23.507) 73.283,22.583 76.356,25.656 ccw(c74.56,27.452) 77.1,27.452 77.1,45.265 cw(c80.04,45.265) 77.961,47.344 78.742,48.125 ccw(c78.38,48.487) 78.892,48.487 78.892,48.622 cw(c79.078,48.622) C38_U_band_pass_diff_filter1.1@78.946,48.754 cw(c79.078,48.622) 79.078,48.808 ccw(c79.078,49.725) 79.727,49.077 83.106,52.456 ccw(c82.397,53.166) 83.4,53.166 U7.43@83.4,53.65
MIC_FILTER_OUT_U_band_pass_diff_filter1_P: C26_U_band_pass_diff_filter1.2 C33_U_band_pass_diff_filter1.2 C38_U_band_pass_diff_filter1.2 R40_U_band_pass_diff_filter1.2 U7.44 | length 44.4
  Top Layer w0.2: R40_U_band_pass_diff_filter1.2@66.45,18.8 67.8,18.8 ccw(c67.8,19.8) 68.8,19.8 68.8,20.9 cw(c69.4,20.9) 69.4,21.5 C33_U_band_pass_diff_filter1.2@70,21.5 ; C33_U_band_pass_diff_filter1.2@70.205,21.562 C26_U_band_pass_diff_filter1.2@71.037,21.562 ; C26_U_band_pass_diff_filter1.2@71.3,21.325 ccw(c71.3,21.427) 71.372,21.355 71.376,21.359 cw(c72.441,20.293) 72.441,21.8 ccw(c72.441,23.307) 73.507,22.241 76.639,25.373 ccw(c74.56,27.452) 77.5,27.452 77.5,45.265 cw(c80.04,45.265) 78.244,47.061 79.025,47.842 cw(c79.387,47.48) 79.387,47.992 79.522,47.992 ccw(c79.522,48.178) C38_U_band_pass_diff_filter1.2@79.654,48.046 ccw(c79.522,48.178) 79.708,48.178 cw(c80.467,48.178) 79.93,48.715 83.389,52.173 ccw(c82.397,53.166) 83.8,53.166 U7.44@83.8,53.65
MIC_FILTER_OUT_U_band_pass_diff_filter2_N: C33_U_band_pass_diff_filter2.1 C38_U_band_pass_diff_filter2.1 C43_U_band_pass_diff_filter2.1 R49_U_band_pass_diff_filter2.2 U7.41 | length 27.5
  Top Layer w0.2: R49_U_band_pass_diff_filter2.2@66.45,45.2 67.8,45.2 cw(c67.8,44.2) 68.8,44.2 68.8,43.1 ccw(c69.4,43.1) 69.4,42.5 C33_U_band_pass_diff_filter2.1@70,42.5 70.205,42.437 C43_U_band_pass_diff_filter2.1@71.037,42.437 ; C43_U_band_pass_diff_filter2.1@71.3,42.675 cw(c71.3,42.573) 71.372,42.645 71.47,42.547 ccw(c72.309,43.386) 72.309,42.2 ccw(c72.309,43.386) 73.147,42.547 74.256,43.656 ccw(c72.46,45.452) 75,45.452 75,51.834 cw(c76.766,51.834) 75.517,53.083 75.608,53.174 cw(c76.879,51.903) 76.879,53.7 77.411,53.7 ccw(c77.411,54.212) C38_U_band_pass_diff_filter2.1@77.773,53.85 ; C38_U_band_pass_diff_filter2.1@78,54 cw(c78,53.814) 78.132,53.945 78.227,53.85 ccw(c78.589,54.212) 78.589,53.7 79.106,53.7 ccw(c79.106,55.459) 80.349,54.215 80.417,54.283 cw(c81.666,53.034) 81.666,54.8 U7.41@82.65,54.8
MIC_FILTER_OUT_U_band_pass_diff_filter2_P: C26_U_band_pass_diff_filter2.2 C33_U_band_pass_diff_filter2.2 C38_U_band_pass_diff_filter2.2 R40_U_band_pass_diff_filter2.2 U7.42 | length 27.5
  Top Layer w0.2: R40_U_band_pass_diff_filter2.2@66.45,38.8 67.8,38.8 ccw(c67.8,39.8) 68.8,39.8 68.8,40.9 cw(c69.4,40.9) 69.4,41.5 C33_U_band_pass_diff_filter2.2@70,41.5 70.205,41.562 C26_U_band_pass_diff_filter2.2@71.037,41.562 ; C26_U_band_pass_diff_filter2.2@71.3,41.325 ccw(c71.3,41.427) 71.372,41.355 71.411,41.394 cw(c72.391,40.414) 72.391,41.8 ccw(c72.391,43.186) 73.372,42.206 74.539,43.373 ccw(c72.46,45.452) 75.4,45.452 75.4,51.834 cw(c76.766,51.834) 75.8,52.8 75.832,52.832 cw(c76.961,51.703) 76.961,53.3 77.411,53.3 cw(c77.411,52.788) C38_U_band_pass_diff_filter2.2@77.773,53.15 ; C38_U_band_pass_diff_filter2.2@78,53 ccw(c78,53.186) 78.132,53.055 78.227,53.15 cw(c78.589,52.788) 78.589,53.3 79.189,53.3 ccw(c79.189,55.259) 80.574,53.874 80.7,54 cw(c81.666,53.034) 81.666,54.4 U7.42@82.65,54.4
MIC_FILTER_OUT_U_band_pass_diff_filter3_N: C33_U_band_pass_diff_filter3.1 C38_U_band_pass_diff_filter3.1 C43_U_band_pass_diff_filter3.1 R49_U_band_pass_diff_filter3.2 U7.39 | length 18.7
  Top Layer w0.2: R49_U_band_pass_diff_filter3.2@66.45,61.2 67.8,61.2 cw(c67.8,60.2) 68.8,60.2 68.8,59.1 ccw(c69.4,59.1) 69.4,58.5 C33_U_band_pass_diff_filter3.1@70,58.5 ; C33_U_band_pass_diff_filter3.1@70.205,58.438 C43_U_band_pass_diff_filter3.1@71.037,58.438 ; C43_U_band_pass_diff_filter3.1@71.3,58.675 cw(c71.3,58.573) 71.372,58.645 ccw(c72.447,59.72) 72.447,58.2 73.055,58.2 cw(c73.055,55.639) 74.866,57.45 74.872,57.444 ccw(c76.668,59.24) 76.668,56.7 77.411,56.7 ccw(c77.411,57.212) 77.773,56.85 77.868,56.945 cw(c78,56.814) C38_U_band_pass_diff_filter3.1@78,57 cw(c78,56.814) 78.132,56.945 ccw(c78.724,57.538) 78.724,56.7 78.74,56.7 cw(c78.74,54.822) 80.068,56.15 ccw(c81.396,57.478) 81.396,55.6 U7.39@82.65,55.6
MIC_FILTER_OUT_U_band_pass_diff_filter3_P: C26_U_band_pass_diff_filter3.2 C33_U_band_pass_diff_filter3.2 C38_U_band_pass_diff_filter3.2 R40_U_band_pass_diff_filter3.2 U7.40 | length 18.7
  Top Layer w0.2: R40_U_band_pass_diff_filter3.2@66.45,54.8 67.8,54.8 ccw(c67.8,55.8) 68.8,55.8 68.8,56.9 cw(c69.4,56.9) 69.4,57.5 C33_U_band_pass_diff_filter3.2@70,57.5 ; C33_U_band_pass_diff_filter3.2@70.205,57.562 C26_U_band_pass_diff_filter3.2@71.037,57.562 ; C26_U_band_pass_diff_filter3.2@71.3,57.325 ccw(c71.3,57.427) 71.372,57.355 cw(c72.447,56.28) 72.447,57.8 72.898,57.8 cw(c72.898,55.26) 74.694,57.056 ccw(c76.519,58.881) 76.519,56.3 77.411,56.3 cw(c77.411,55.788) 77.773,56.15 77.868,56.055 ccw(c78,56.186) C38_U_band_pass_diff_filter3.2@78,56 ccw(c78,56.186) 78.132,56.055 cw(c78.724,55.462) 78.724,56.3 cw(c78.724,54.783) 79.797,55.856 ccw(c81.38,57.439) 81.38,55.2 U7.40@82.65,55.2
MIC_FILTER_OUT_U_band_pass_diff_filter4_N: C33_U_band_pass_diff_filter4.1 C38_U_band_pass_diff_filter4.1 C43_U_band_pass_diff_filter4.1 R49_U_band_pass_diff_filter4.2 U7.37 | length 34.8
  Top Layer w0.2: R49_U_band_pass_diff_filter4.2@66.45,81.2 67.8,81.2 cw(c67.8,80.2) 68.8,80.2 68.8,79.1 ccw(c69.4,79.1) 69.4,78.5 C33_U_band_pass_diff_filter4.1@70,78.5 ; C33_U_band_pass_diff_filter4.1@70.205,78.437 C43_U_band_pass_diff_filter4.1@71.037,78.437 ; C43_U_band_pass_diff_filter4.1@71.3,78.675 cw(c71.3,78.573) 71.372,78.645 ccw(c72.447,79.72) 72.447,78.2 cw(c72.447,76.464) 73.674,77.692 76.239,75.127 cw(c74.16,73.048) 77.1,73.048 77.1,61.343 ccw(c78.935,61.343) 77.637,60.045 78.025,59.658 ccw(c78.387,60.02) 78.387,59.508 78.522,59.508 cw(c78.522,59.322) C38_U_band_pass_diff_filter4.1@78.654,59.454 cw(c78.522,59.322) 78.708,59.322 78.708,59.187 ccw(c79.22,59.187) 78.858,58.825 79.674,58.009 ccw(c79.704,58.038) 79.704,57.996 80.9,56.8 ccw(c81.866,57.766) 81.866,56.4 U7.37@82.65,56.4
MIC_FILTER_OUT_U_band_pass_diff_filter4_P: C26_U_band_pass_diff_filter4.2 C33_U_band_pass_diff_filter4.2 C38_U_band_pass_diff_filter4.2 R40_U_band_pass_diff_filter4.2 U7.38 | length 34.8
  Top Layer w0.2: R40_U_band_pass_diff_filter4.2@66.45,74.8 67.8,74.8 ccw(c67.8,75.8) 68.8,75.8 68.8,76.9 cw(c69.4,76.9) 69.4,77.5 C33_U_band_pass_diff_filter4.2@70,77.5 ; C33_U_band_pass_diff_filter4.2@70.205,77.562 C26_U_band_pass_diff_filter4.2@71.037,77.562 ; C26_U_band_pass_diff_filter4.2@71.3,77.325 ccw(c71.3,77.427) 71.372,77.355 71.399,77.382 cw(c72.409,76.372) 72.409,77.8 cw(c72.409,76.372) 73.418,77.382 75.956,74.844 cw(c74.16,73.048) 76.7,73.048 76.7,61.26 ccw(c78.735,61.26) 77.296,59.821 77.742,59.375 cw(c77.38,59.013) 77.892,59.013 77.892,58.878 ccw(c78.078,58.878) C38_U_band_pass_diff_filter4.2@77.946,58.746 ccw(c78.078,58.878) 78.078,58.692 78.213,58.692 cw(c78.213,58.18) 78.575,58.542 79.509,57.609 ccw(c79.538,57.638) 79.538,57.596 80.617,56.517 ccw(c81.866,57.766) 81.866,56 U7.38@82.65,56
NetC1_U_MIC_connection1_2: C1_U_MIC_connection1.2 R3_U_MIC_connection1.1 R4_U_MIC_connection1.2 | length 2.7
  Top Layer w0.5: R4_U_MIC_connection1.2@4.8,14.5 R3_U_MIC_connection1.1@6.1,14.5 C1_U_MIC_connection1.2@6.1,13.1
NetC1_U_MIC_connection2_2: C1_U_MIC_connection2.2 R3_U_MIC_connection2.1 R4_U_MIC_connection2.2 | length 2.7
  Top Layer w0.5: R4_U_MIC_connection2.2@4.8,32.5 R3_U_MIC_connection2.1@6.1,32.5 C1_U_MIC_connection2.2@6.1,31.1
NetC1_U_MIC_connection3_2: C1_U_MIC_connection3.2 R3_U_MIC_connection3.1 R4_U_MIC_connection3.2 | length 2.7
  Top Layer w0.5: R4_U_MIC_connection3.2@4.8,50.5 R3_U_MIC_connection3.1@6.1,50.5 C1_U_MIC_connection3.2@6.1,49.1
NetC1_U_MIC_connection4_2: C1_U_MIC_connection4.2 R3_U_MIC_connection4.1 R4_U_MIC_connection4.2 | length 2.7
  Top Layer w0.5: R4_U_MIC_connection4.2@4.8,68.5 R3_U_MIC_connection4.1@6.1,68.5 C1_U_MIC_connection4.2@6.1,67.1
NetC2_U_MIC_connection1_2: C2_U_MIC_connection1.2 R52_U_MIC_connection1.2 R53_U_MIC_connection1.1 | length 3
  Top Layer w0.5: R52_U_MIC_connection1.2@10.95,14.5 R53_U_MIC_connection1.1@10.95,16.1 C2_U_MIC_connection1.2@12.375,16.1
NetC2_U_MIC_connection2_2: C2_U_MIC_connection2.2 R52_U_MIC_connection2.2 R53_U_MIC_connection2.1 | length 3
  Top Layer w0.5: R52_U_MIC_connection2.2@10.95,32.5 R53_U_MIC_connection2.1@10.95,34.1 C2_U_MIC_connection2.2@12.375,34.1
NetC2_U_MIC_connection3_2: C2_U_MIC_connection3.2 R52_U_MIC_connection3.2 R53_U_MIC_connection3.1 | length 3
  Top Layer w0.5: R52_U_MIC_connection3.2@10.95,50.5 R53_U_MIC_connection3.1@10.95,52.1 C2_U_MIC_connection3.2@12.375,52.1
NetC2_U_MIC_connection4_2: C2_U_MIC_connection4.2 R52_U_MIC_connection4.2 R53_U_MIC_connection4.1 | length 3.1
  Top Layer w0.5: R52_U_MIC_connection4.2@10.95,68.5 R53_U_MIC_connection4.1@10.95,70.1 12.375,70.1 ccw(c12.375,70.125) C2_U_MIC_connection4.2@12.4,70.125
NetC3_U_MIC_connection1_1: C3_U_MIC_connection1.1 R4_U_MIC_connection1.1 R54_U_MIC_connection1.2 | length 2.9
  Top Layer w0.5: C3_U_MIC_connection1.1@2.2,16 3.5,16 cw(c3.5,15.9) R54_U_MIC_connection1.2@3.6,15.9 ccw(c3.6,15.8) 3.5,15.8 R4_U_MIC_connection1.1@3.5,14.5
NetC3_U_MIC_connection2_1: C3_U_MIC_connection2.1 R4_U_MIC_connection2.1 R54_U_MIC_connection2.2 | length 2.9
  Top Layer w0.5: C3_U_MIC_connection2.1@2.2,34 3.5,34 cw(c3.5,33.9) R54_U_MIC_connection2.2@3.6,33.9 ccw(c3.6,33.8) 3.5,33.8 R4_U_MIC_connection2.1@3.5,32.5
NetC3_U_MIC_connection3_1: C3_U_MIC_connection3.1 R4_U_MIC_connection3.1 R54_U_MIC_connection3.2 | length 2.9
  Top Layer w0.5: C3_U_MIC_connection3.1@2.2,52 3.5,52 cw(c3.5,51.9) R54_U_MIC_connection3.2@3.6,51.9 ccw(c3.6,51.8) 3.5,51.8 R4_U_MIC_connection3.1@3.5,50.5
NetC3_U_MIC_connection4_1: C3_U_MIC_connection4.1 R4_U_MIC_connection4.1 R54_U_MIC_connection4.2 | length 2.9
  Top Layer w0.5: C3_U_MIC_connection4.1@2.2,70 3.5,70 cw(c3.5,69.9) R54_U_MIC_connection4.2@3.6,69.9 ccw(c3.6,69.8) 3.5,69.8 R4_U_MIC_connection4.1@3.5,68.5
NetC5_U_double_preamp1_1: C5_U_double_preamp1.1 R13_U_double_preamp1.1 R24_U_double_single_to_diff_conv1.2 | length 4.9
  Top Layer w0.2: C5_U_double_preamp1.1@23.725,39.8 23.725,38.26 ccw(c23.785,38.26) 23.785,38.2 24.7,38.2 cw(c24.7,37.35) 25.55,37.35 R24_U_double_single_to_diff_conv1.2@25.55,36.3
NetC5_U_double_preamp1_2: C5_U_double_preamp1.2 R7_U_double_preamp1.1 | length 3
  Top Layer w0.2: R7_U_double_preamp1.1@20.6,39.8 C5_U_double_preamp1.2@22.075,39.8 R7_U_double_preamp1.1@20.6,39.8
NetC5_U_double_preamp2_1: C5_U_double_preamp2.1 R13_U_double_preamp2.1 R24_U_double_single_to_diff_conv2.2 | length 4.9
  Top Layer w0.2: C5_U_double_preamp2.1@23.725,75.8 23.725,74.26 ccw(c23.785,74.26) 23.785,74.2 24.7,74.2 cw(c24.7,73.35) 25.55,73.35 R24_U_double_single_to_diff_conv2.2@25.55,72.3
NetC5_U_double_preamp2_2: C5_U_double_preamp2.2 R7_U_double_preamp2.1 | length 1.5
  Top Layer w0.2: R7_U_double_preamp2.1@20.6,75.8 C5_U_double_preamp2.2@22.075,75.8
NetC6_U_double_preamp1_1: C6_U_double_preamp1.1 R12_U_double_preamp1.1 U1_U_double_preamp1.3 | length 4.4
  Top Layer w0.2: R12_U_double_preamp1.1@13.848,38.1 13.848,39.798 C6_U_double_preamp1.1@13.85,39.8 14.138,39.8 14.465,39.8 cw(c14.465,38.975) 14.781,39.737 cw(c14.21,38.359) 15.264,39.415 ccw(c15.841,39.991) 15.841,39.175 16.2,39.175 U1_U_double_preamp1.3@16.35,39.175
NetC6_U_double_preamp1_2: C6_U_double_preamp1.2 R1_U_MIC_connection2.2 R2_U_MIC_connection2.2 | length 4.7
  Top Layer w0.2: R1_U_MIC_connection2.2@12.527,41.607 ccw(c12.527,41.03) 11.95,41.03 C6_U_double_preamp1.2@11.95,39.8 11.95,38.19 ccw(c12.564,38.19) R2_U_MIC_connection2.2@12.564,37.576
NetC6_U_double_preamp2_1: C6_U_double_preamp2.1 R12_U_double_preamp2.1 U1_U_double_preamp2.3 | length 4.4
  Top Layer w0.2: R12_U_double_preamp2.1@13.848,74.1 13.848,75.798 C6_U_double_preamp2.1@13.85,75.8 14.138,75.8 14.465,75.8 cw(c14.465,74.975) 14.781,75.737 cw(c14.21,74.359) 15.264,75.415 ; 15.265,75.414 ccw(c15.841,75.991) 15.841,75.175 16.2,75.175 U1_U_double_preamp2.3@16.35,75.175
NetC6_U_double_preamp2_2: C6_U_double_preamp2.2 R1_U_MIC_connection4.2 R2_U_MIC_connection4.2 | length 4.7
  Top Layer w0.2: R1_U_MIC_connection4.2@12.527,77.607 ccw(c12.527,77.03) 11.95,77.03 C6_U_double_preamp2.2@11.95,75.8 11.95,74.19 ccw(c12.564,74.19) R2_U_MIC_connection4.2@12.564,73.576
NetC14_U_double_preamp1_1: C14_U_double_preamp1.1 R19_U_double_preamp1.1 R31_U_double_single_to_diff_conv1.2 | length 5
  Top Layer w0.2: C14_U_double_preamp1.1@23.725,24.1 23.725,25.675 ccw(c23.7,25.675) R19_U_double_preamp1.1@23.7,25.7 cw(c23.64,25.64) R19_U_double_preamp1.1@23.725,25.64 ; R19_U_double_preamp1.1@23.81,25.675 24.725,25.675 ccw(c24.725,26.525) 25.575,26.525 R31_U_double_single_to_diff_conv1.2@25.575,27.575
NetC14_U_double_preamp1_2: C14_U_double_preamp1.2 R18_U_double_preamp1.1 | length 3
  Top Layer w0.2: R18_U_double_preamp1.1@20.6,24.1 C14_U_double_preamp1.2@22.075,24.1 R18_U_double_preamp1.1@20.6,24.1
NetC14_U_double_preamp2_1: C14_U_double_preamp2.1 R19_U_double_preamp2.1 R31_U_double_single_to_diff_conv2.2 | length 4.9
  Top Layer w0.2: R19_U_double_preamp2.1@23.7,61.7 cw(c23.7,61.675) 23.725,61.675 C14_U_double_preamp2.1@23.725,60.1 ; R19_U_double_preamp2.1@23.81,61.675 24.725,61.675 ccw(c24.725,62.525) 25.575,62.525 R31_U_double_single_to_diff_conv2.2@25.575,63.575
NetC14_U_double_preamp2_2: C14_U_double_preamp2.2 R18_U_double_preamp2.1 | length 1.5
  Top Layer w0.2: R18_U_double_preamp2.1@20.6,60.1 C14_U_double_preamp2.2@22.075,60.1
NetC15_U_double_preamp1_1: C15_U_double_preamp1.1 R17_U_double_preamp1.2 U3_U_double_preamp1.3 | length 8.9
  Top Layer w0.2: R17_U_double_preamp1.2@13.848,23.1 13.85,23.098 C15_U_double_preamp1.1@13.85,21.4 17.016,21.4 ccw(c17.016,22.634) 18.25,22.634 U3_U_double_preamp1.3@18.25,24.725
NetC15_U_double_preamp1_2: C15_U_double_preamp1.2 R1_U_MIC_connection1.2 R2_U_MIC_connection1.2 | length 4.7
  Top Layer w0.2: R1_U_MIC_connection1.2@12.527,23.607 ccw(c12.527,23.03) 11.95,23.03 11.95,21.8 11.95,20.19 ccw(c12.564,20.19) R2_U_MIC_connection1.2@12.564,19.576